# Altium PCB Fred_ New.PcbDoc (part 2 of 2)
Units mil, origin at the board's own origin, x right, y up, seen from the top; angles counter-clockwise.
Board outline 2300 x 2166 mil, 2 copper layers (Top Layer, Bottom Layer), stack 57 mil thick; 107 components, 63 nets, 302 pads, 87 vias.
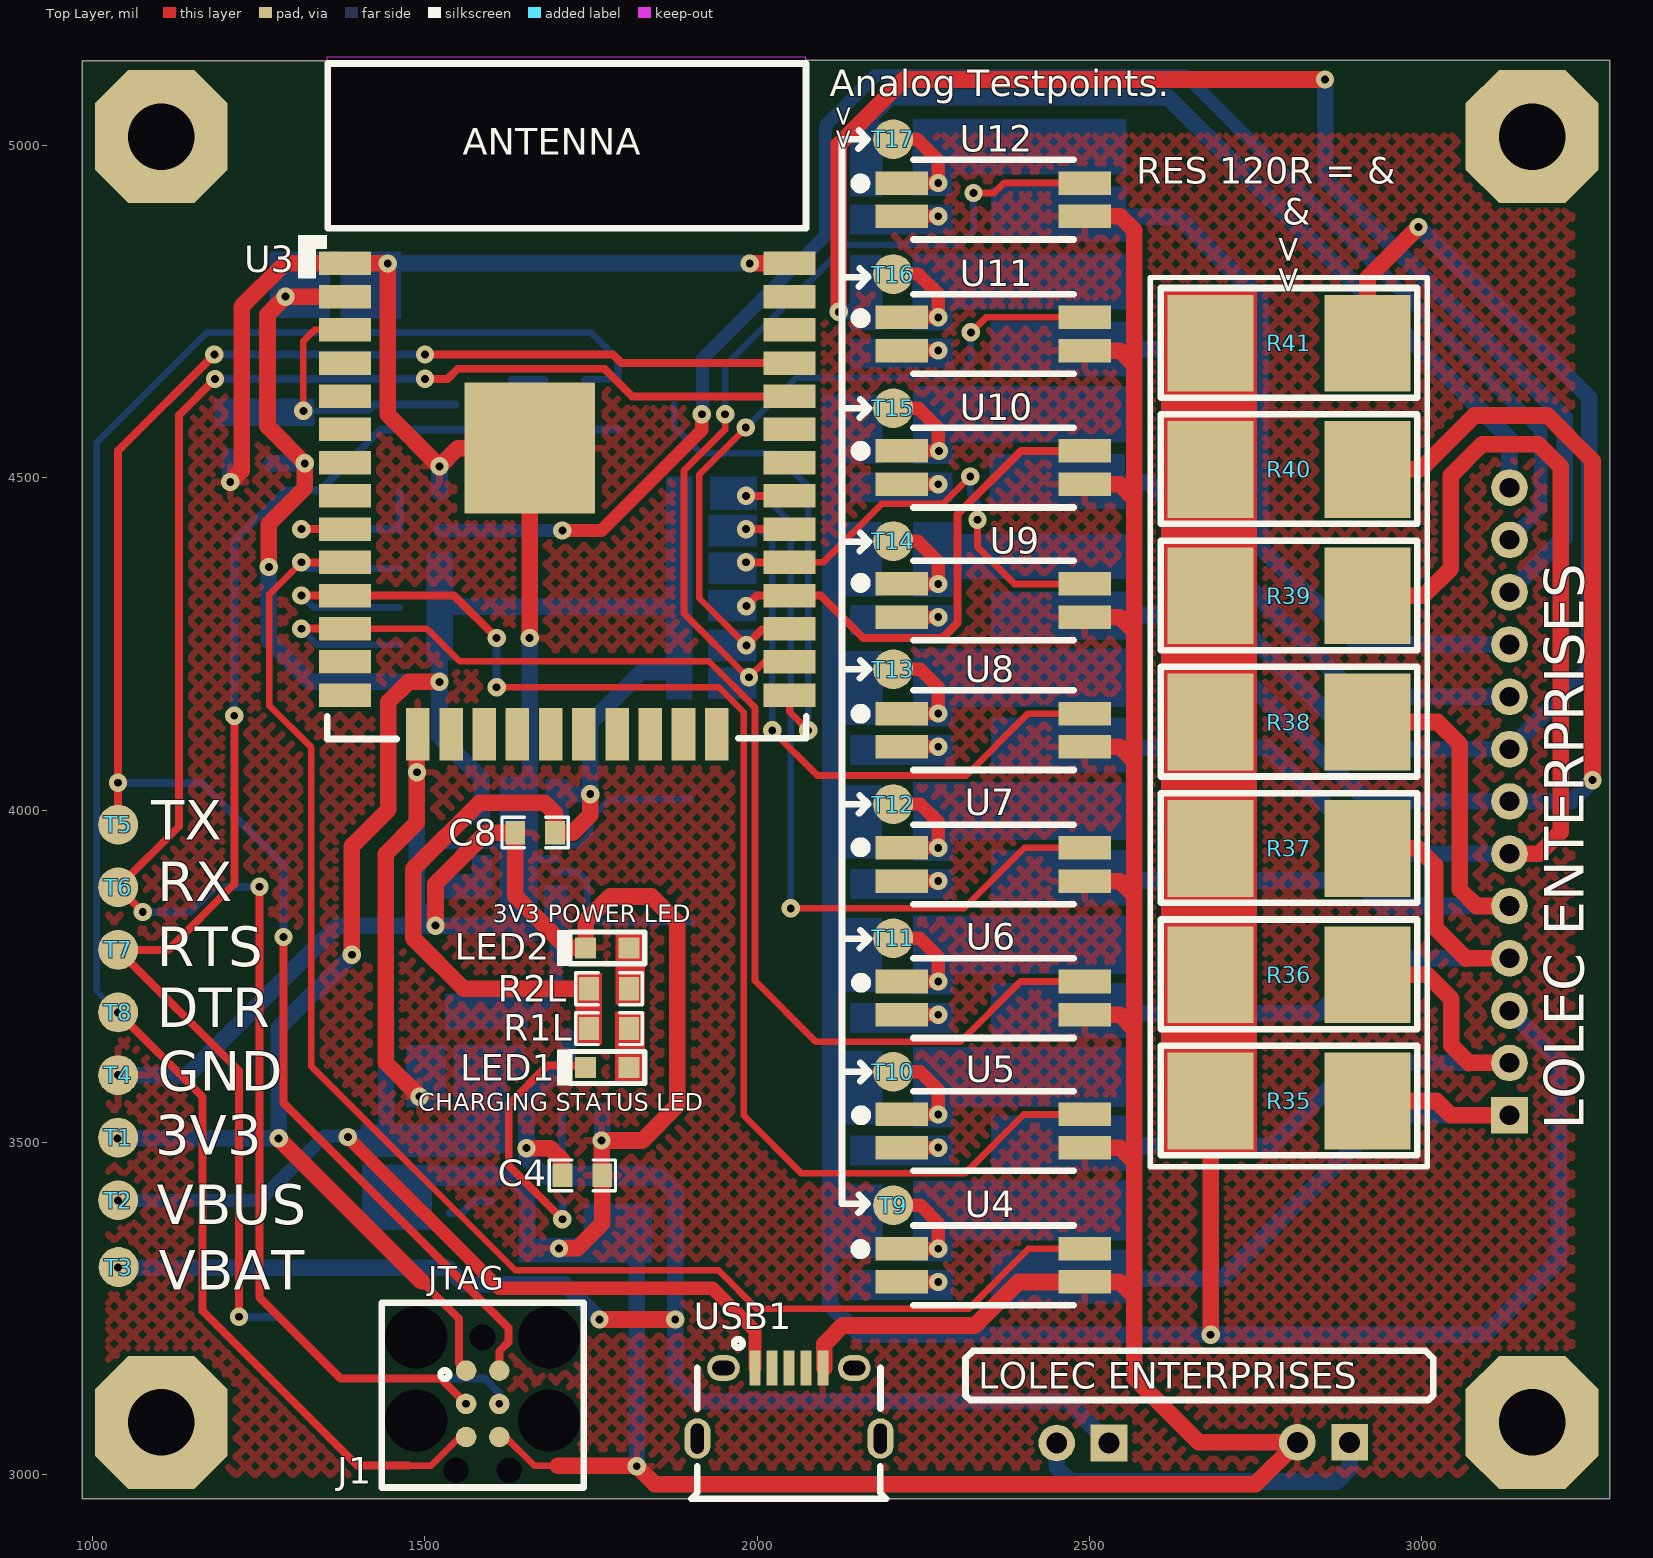
[diagram p0: Top Layer view]

## Via types
v1: diameter 27.56, hole 11.81, Top Layer to Bottom Layer, tented both sides, 57 vias
v2: diameter 27.56, hole 11.81, Top Layer to Bottom Layer, 30 vias

## Nets (pads, with @x,y where several pads share a name; then routed paths per layer and width w, separated by ;. In a path a pad name is that pad's centre, name@x,y a point inside that pad or via, vN(x,y) a via of type N, cw(c..) or ccw(c..) an arc to the next point about the centre after c; other vN are vias at no path point) (continued)
Cath_9: R30.2 U11.2 | length 55
  Top Layer w20: U11.2 v1(2273,4691.81)
Cath_10: R23.2 U12.2 | length 55
  Top Layer w20: U12.2 v1(2273,4894)
CHG: LED1.2 U2.3 | length 377.9
  Top Layer w12: v1(1707,3384) 1626.22,3464.78 1626.22,3556.94 1684.74,3615.46 LED1.2@1742.04,3615.46
  Bottom Layer w12: U2.3 1707,3410.24 v1(1707,3384) v1@1707,3380
DTR: J1.5 Q2.2 R4.2 T8.1 | length 2835.6
  Top Layer w10: 1475,3013 1509.44,3013 1552.44,3056 J1.5
  Top Layer w12: v2(1038,3695.24) 1165,3568.24 1165,3246 1398,3013 1475,3013
  Bottom Layer w10: v2(1038,3695.24) 1006,3727.24 1006,4553.38 1171.62,4719 1750,4719 1790.68,4678.32 Q2.2 1740.69,4648.4 R4.2
ENABLE: C13.1 Q1.3 R19.1 U3.3 | length 456.1
  Top Layer w10: v2(1317,4601) 1317,4706 1334,4723 U3.3
  Bottom Layer w10: R19.1 v2(1317,4601) 1415.41,4601 1424.71,4610.3
  Bottom Layer w12: 1424.71,4610.3 Q1.3
ESP_BATSIG: R16.1 U3.27 U11.4 | length 1066.5
  Top Layer w10: v1@1983.5,4575.5 1913,4505 1913,4319 v1(1984,4248) ; v1(2322,4719.18) 2344.63,4741.81 U11.4
  Top Layer w12: v1(1984,4248) 2007.63,4271.63 2047.63,4271.63 U3.27
  Bottom Layer w10: v1@1983.5,4575.5 2059,4651 2298.34,4651 2322,4674.66 v1(2322,4719.18)
  other v1: 1983,4576
ESP_FOG: R9.1 U3.11 U5.4 | length 2131.3
  Top Layer w10: v2(1608,4185) 1942.36,4185 1980,4147.36 1980,3540 2067,3453 2313,3453 2401.68,3541.68 U5.4
  Top Layer w12: v1(1314,4323) U3.11 1544,4323 v2(1608,4259)
  Bottom Layer w10: v1(1314,4323) 1332,4305 R9.1@1462,4305
  Bottom Layer w12: v2(1608,4185) v2(1608,4259)
ESP_IGNSIG: R17.1 U3.26 U12.4 | length 1313.5
  Top Layer w10: v1(1952,4596) 1952,4573 1890,4511 1890,4296 1986,4200 v1(1988,4200) 2011,4223 U3.26 ; v2(2326,4929) 2357,4929 2372,4944 U12.4 2510.45,4944 U12.4@2511,4943.45
  Bottom Layer w10: v1(1952,4596) 1952,4669 2134,4851 2305,4851 2326,4872 v2(2326,4929)
ESP_LT: R3.1 U3.10 U4.4 | length 2376.2
  Top Layer w10: v1(1314,4373) 1265.58,4324.58 1265.58,4157.42 1329,4094 1329,3614 1636,3307 1942,3307 2000,3249 2318.35,3249 2408.85,3339.5 U4.4
  Top Layer w12: v1(1314,4373) U3.10
  Bottom Layer w10: v1(1314,4373) 1323.37,4363.63 R3.1
ESP_PL: R14.1 U3.29 U9.4 | length 688.8
  Top Layer w10: U3.29 2049.22,4373.22 2100.22,4373.22 2187.91,4460.91 2279.74,4460.91 v2(2321,4502.17) ; v1(2332,4437) 2332,4396 2387.56,4340.44 U9.4
  Top Layer w12: v1(1983.29,4373) U3.29
  Bottom Layer w10: v1@1981.69,4374.6 v1(1983.29,4373) ; v2(2321,4502.17) 2321,4474.44 2332,4463.44 v1(2332,4437)
ESP_PR: R11.1 U3.31 U7.4 | length 1251.4
  Top Layer w10: v2@2051.78,3852 2311.3,3852 2402.36,3943.06 U7.4
  Top Layer w12: v1(1983.29,4473) U3.31
  Bottom Layer w10: R11.1 1978.03,4478.26 v1(1983.29,4473) 2010.83,4473 2049.78,4434.05 ; v2@2050.78,3853 2050.78,4434.05
  other v2: 2050.78,3852
ESP_REV: R15.1 U3.28 U10.4 | length 755.3
  Top Layer w12: v1(1984,4307) 2000,4323 U3.28 2096,4323 2160,4259 2279.44,4259 2302,4281.56 2302,4445.29 2397.33,4540.62 U10.4
ESP_RT: R10.1 U3.12 U6.4 | length 1855.7
  Top Layer w10: U3.12 1503,4273 1552,4224 1927.4,4224 1997,4154.4 1997,3743 2089,3651 2306,3651 2396.87,3741.87 U6.4@2475.5,3741.87
  Top Layer w12: v1(1314,4273) U3.12
  Bottom Layer w10: v1(1314,4273) 1338,4249 R10.1
ESP_SL: R12.1 U3.30 U8.4 | length 934.7
  Top Layer w10: v2(2023,4120) 2091,4052 2315,4052 2408.25,4145.25 U8.4
  Top Layer w12: v1(1983.29,4423) U3.30
  Bottom Layer w10: v1(1983.29,4423) 2004,4423 2023,4404 v2(2023,4120)
"FOG LIGHT": J3.2 R7.2 R36.2 | length 1041.2
  Top Layer w25: R36.2 3008.83,3752.17 3045,3716 3045,3646 3071.92,3619.08 3072.14,3619.3 J3.2 ; J3.2@3123.78,3619.08 J3.2@3124,3619.3
  Bottom Layer w25: R7.2 2774.2,3494.2 2899.3,3619.3 J3.2
GND: C1.2 C2.2 C3.2 C4.2 C5.2 C6.2 C7.2 C8.2 C9.2 C10.2 C11.2 C12.2 C13.2 J1.6 J2#.2 LED2.2 R1.1 R2.1 R34.2 R44.1 T4.1 U1.3 U1.9 U1.11 U2.5 U3.1 U3.15 U3.38 U3.39 U4.3 U5.3 U6.3 U7.3 U8.3 U9.3 U10.3 U11.3 U12.3 USB1.5 | length 10376.7
  Top Layer w10: J1.6 1621.56,3056 1664.56,3013 1700,3013
  Top Layer w25: v2(1207,4494) 1224,4511 1224,4758 1289,4823 U3.1 v1(1444,4823) 1444,4595.49 v2(1522,4517.49) 1549.51,4545 U3.39 v1(1657.71,4259) ; U3.15 1488,4112.59 v1(1488,4057) 1488,3981 1441,3934 1441,3619.5 v1(1492,3568.5) ; v1(1516,3826) 1516,3889 1593,3966 C8.2 1636,3870.48 1714.02,3792.46 LED2.2 1742.04,3833.04 1778.87,3869.87 1841.13,3869.87 1880,3831 1880,3555 1827.5,3502.5 v1(1766,3502.5) 1766,3451 C4.2 1767,3377.69 1729.31,3340 v1(1702,3340) ; 1700,3013 v2@1819,3013 ; v2(1819,3012) 1846,2985 2750.63,2985 J2#.2 2665.42,3048 2568.26,3145.17 2568.26,3267.46 ; v1(1989,4823) U3.38 ; USB1.5@2101.36,3160 2101.36,3196.36 2129,3224 2328,3224 2393.5,3289.5 U4.3 2546.22,3289.5 2568.26,3267.46 ; U5.3 2546.22,3491.68 2568.26,3469.65 ; U6.3 2546.22,3691.87 2568.26,3669.84 ; U7.3 2546.22,3893.06 2568.26,3871.02 ; U8.3 2546.22,4095.25 2568.26,4073.21 ; U9.3 2546.22,4290.44 2568.26,4268.4 ; U10.3 2546.22,4490.62 2568.26,4468.59 ; U11.3 2546.22,4691.81 2568.26,4669.77 ; U12.3 2547,4894 2568.26,4872.74 2568.26,4669.77 ; 2568.26,3267.46 2568.26,3469.65 ; 2568.26,3469.65 2568.26,3669.84 ; 2568.26,3669.84 2568.26,3871.02 ; 2568.26,3871.02 2568.26,4073.21 ; 2568.26,4073.21 2568.26,4268.4 ; 2568.26,4268.4 2568.26,4468.59 ; 2568.26,4468.59 2568.26,4669.77
  Bottom Layer w10: C6.2 1533.06,3946.06 U1.9 U1.11@1634.51,3946.06
  Bottom Layer w12: U1.11 U1.3
  Bottom Layer w25: v2(1038,3600.99) 1143.57,3600.99 1368.58,3826 v1(1516,3826) ; C13.2 1206.83,4494.17 v2(1207,4494) ; v1(1444,4823) v1(1989,4823) ; v1(1488,4057) 1488,3854 v1(1516,3826) ; v1(1492,3568.5) 1507,3583.5 R44.1 ; R34.2 v2(1522,4517.49) ; U2.5 1631.1,3448.5 1654,3425.6 1654,3341.4 1655.4,3340 v1(1702,3340) ; C10.2@1634.52,3826 v1(1516,3826) ; 1657,4028 1657.71,4028.71 v1(1657.71,4259) ; C5.2 C3.2 v2(1819,3012) ; v1(1766,3502.5) 1767,3502.5 R2.1
GND_1: D1.1 D2.1 D3.1 D4.1 D5.1 D6.1 D7.1 J3.3 R20.1 R21.1 R24.1 R25.1 R26.1 R28.1 R29.1 R35.1 R36.1 R37.1 R38.1 R39.1 R40.1 R41.1 | length 3345.9
  Top Layer w25: R35.1@2620.89,3537.12 R35.1@2620.89,3562 ; R35.1 2683,3561.89 v2(2683,3210)
  Bottom Layer w25: R21.1@2164.49,3546.15 R21.1 ; D7.1 2135.5,4603.5 2110.28,4578.28 2110.28,3254.37 2154.65,3210 v2(2683,3210) 3095.39,3210 3207,3321.61 3207,3624.04 J3.3 J3.3@3124,3698.04
"IGNITION POWER": J3.10 R8.2 | length 1164.3
  Bottom Layer w25: R8.2 2633.68,4893.32 2759,4768 2759,4395 2904.78,4249.22 J3.10
IO_0: Q2.3 U3.25 | length 704.2
  Top Layer w10: U3.25 2049,4148 v1(2077,4120)
  Bottom Layer w10: Q2.3 1875.32,4577.68 1916,4537 2027,4537 2077,4487 v1(2077,4120)
IO_33: R33.1 R34.1 U3.9 | length 271.9
  Top Layer w12: v1(1314,4423) U3.9
  Bottom Layer w12: v1(1314,4423) 1459.95,4423 R33.1 R34.1
ISET: R1.2 U2.4 | length 70.3
  Bottom Layer w12: R1.2 1555,3393 1573.1,3411.1 U2.4
"LEFT TURN": J3.1 R6.2 R35.2 | length 1012.3
  Top Layer w25: R35.2 3023,3562 3044.66,3540.34 3044.88,3540.56 J3.1 ; J3.1@3123.78,3540.34 J3.1@3124,3540.56
  Bottom Layer w25: R6.2@2431,3290.32 R6.2@2439,3290.32 ; R6.2 2700.35,3294.32 2946.37,3540.34 3056,3540.34 3056.22,3540.56 J3.1
NetL1_1: L1.1 U1.4 | length 263.6
  Bottom Layer w10: U1.4 1730.31,3906.69 1744,3893 1744,3846.49 1759.01,3831.48 L1.1
NetL1_2: L1.2 U1.2 | length 247.8
  Bottom Layer w10: U1.2 1695.83,3947 1730.74,3947 1749,3965.26 1749,3987.31 1778.21,4016.52 L1.2
NetLED1_1: LED1.1 R1L.1
NetLED2_1: LED2.1 R2L.1
NetQ1_1: Q1.1 R4.1 | length 49
  Bottom Layer w12: Q1.1 R4.1
NetQ2_1: Q2.1 R5.1 | length 50.8
  Bottom Layer w12: R5.1 1790.34,4573.25 Q2.1
P_D: C6.1 U1.6 U1.7 U1.8
"PARK LIGHTS (L)": J3.7 R27.2 R40.2 | length 1815.2
  Top Layer w25: R40.2 2998.83,4512.83 3080,4594 3190,4594 3258,4526 v2(3258,4045)
  Bottom Layer w25: R27.2 2638.3,4293.7 2919,4013 J3.7 3226,4013 v2(3258,4045)
"PARK LIGHTS (R)": J3.5 R18.2 R38.2 | length 1152.3
  Top Layer w25: R38.2 3024.75,4132.5 3058,4099.25 3058,3880.8 3083.5,3855.3 3083.72,3855.52 J3.5 ; J3.5@3123.78,3855.3 J3.5@3124,3855.52
  Bottom Layer w25: R18.2 2903.05,3893.95 2941.48,3855.52 J3.5 ; J3.5@3123.78,3855.3 J3.5@3124,3855.52
"REVERSE LIGHTS": J3.8 R31.2 R41.2 | length 2040.6
  Top Layer w25: R41.2 2919.11,4801.08 v2(2996.03,4878)
  Bottom Layer w25: R31.2 2590.43,4493.57 2668,4416 2668,4337.62 2913.88,4091.74 J3.8 3253,4211.74 3253,4621.03 v2(2996.03,4878)
"RIGHT TURN": J3.4 R13.2 R37.2 | length 1051.2
  Top Layer w25: R37.2 2995.64,3942.23 3021,3916.88 3021,3823 3067.44,3776.56 3067.66,3776.78 J3.4 ; J3.4@3123.78,3776.56 J3.4@3124,3776.78
  Bottom Layer w25: R13.2 2845.55,3694.07 2928.03,3776.56 3021,3776.56 3021.22,3776.78 J3.4
RTS: J1.4 Q1.2 R5.2 T7.1 | length 2352.4
  Top Layer w12: v2(1213,4142) 1213,3889 1113.49,3789.49 T7.1 1220,3607.49 v2(1220,3237)
  Bottom Layer w10: Q1.2 1679.65,4572.9 R5.2
  Bottom Layer w12: v2(1213,4142) 1213,4405 1289.23,4481.23 1341.94,4481.23 1433.61,4572.9 Q1.2 ; v2(1220,3237) 1280,3237 1373,3144 1590,3144 1612,3122 v2(1612,3106)
RX: J1.3 T6.1 U3.34 | length 2954.1
  Top Layer w12: v2(1075.14,3846.61) T6.1 1130,3975.75 1130,4595 v2(1184,4649) ; v2(1251,3884.5) 1251,3266 1373,3144 1524,3144 v2(1562,3106) ; v1(1500,4649.21) 1534.21,4649.21 1549.44,4664.44 1770.21,4664.44 1811.65,4623 U3.34
  Bottom Layer w12: v2(1075.14,3846.61) 1146.61,3846.61 1184.5,3884.5 v2(1251,3884.5) ; v2@1184,4649.21 v1(1500,4649.21)
"STOP LIGHTS": J3.6 R22.2 R39.2 | length 1876.2
  Top Layer w25: R39.2 3003.67,4322.67 3044.66,4363.66 3044.66,4503.66 3092,4551 3176,4551 3210,4517 3210,3967 3177.26,3934.26 J3.6 J3.6@3124,3934.26
  Bottom Layer w25: R22.2 2769.18,4093.82 2928.74,3934.26 3077,3934.26 J3.6
TS: R2.2 U2.1 | length 61.5
  Bottom Layer w12: U2.1 1706.15,3546.15 R2.2
TX: J1.2 T5.1 U3.35 | length 2847.2
  Top Layer w12: T5.1 v2(1038,4041) 1038,4541 v1(1183,4686) ; v2(1287,3809) 1287,3559 1626,3220 1626,3199 1612,3185 J1.2 ; v1(1500,4686) 1783,4686 1796,4673 U3.35
  Bottom Layer w12: v2(1038,4041) 1163.31,4041 1287,3917.31 v2(1287,3809) ; v1(1183,4686) v1(1500,4686)
VBAT: C3.1 C4.1 C5.1 J2.1 Q3.3 T3.1 U2.2 | length 2258.1
  Top Layer w25: v1(1653,3491) 1688.51,3491 1707,3472.51 C4.1 ; v2(1763,3233) v2@1866,3233
  Bottom Layer w25: v1(1038,3311) 1534,3311 1559,3286 1710,3286 v2(1763,3233) ; U2.2 1680.76,3448.5 1653,3476.25 v1(1653,3491) 1653,3562.99 1715,3624.99 Q3.3 ; C3.1 1853,3448 1877,3424 v2(1877,3233) 1877,3145 1912,3110 2467,3110 J2.1
VBAT_M: J2#.1 J2.2 | length 534.6
  Bottom Layer w25: J2.2 2451.26,3009.74 2472,2989 2873,2989 2892.37,3008.37 J2#.1
VBUS: C1.1 C2.1 C9.1 D22.1 Q3.1 R44.2 T2.1 U2.6 USB1.1 | length 1465.6
  Top Layer w20: v2(1384,3507.69) 1611.69,3280 1933,3280 1997,3216 USB1.1@1997,3160.18
  Bottom Layer w20: v1(1038,3412) 1251.5,3412 1348.5,3509 C9.1@1429,3509 ; C9.1@1442,3506.5 C1.1 C1.1@1493,3512.5 ; D22.1@1442,3695 D22.1@1444,3697
  Bottom Layer w25: C9.1@1442,3506.5 D22.1@1442,3695
VCC: C10.1 D22.2 Q3.2 U1.5 | length 189.1
  Bottom Layer w20: Q3.2@1621.35,3696.4 Q3.2 1667.4,3696.4 1697.52,3726.52 C10.1@1697.52,3827
pads on no net: J1.MP1 J1.MP2 J1.MP3 J1.MP4 J1.MP5 J1.MP6 J1.MP7 U3.4 U3.5 U3.6 U3.7 U3.8 U3.13 U3.14 U3.16 U3.17 U3.18 U3.19 U3.20 U3.21 U3.22 U3.23 U3.24 U3.32 U3.33 U3.36 U3.37 USB1.2 USB1.3 USB1.4 USB1.MH1 USB1.MH2 USB1.MH3 USB1.MH4

## Polygon pours and split planes (outlines as drawn)
GND on Top Layer "Top Layer-GND" (hatched 45Degree grid 20 track 10, remove dead copper, pour order 1): 1023,4897 1255.33,4897 1255.33,4776.62 2205,4776.62 2205,5015.22 3227,5015.46 3227,2999.42 1023,2999.42
no net on Top Layer "Top Layer-No Net" (solid, pour order 0): 660,5128
GND on Bottom Layer "Bottom Layer-GND" (hatched 45Degree grid 20 track 10, remove dead copper, pour order 3): 1018,4897.07 1259,4896.93 1259,4749 2174,4749 2174,4996.4 3234,4996.65 3234,3013 1018,3013

## Other copper
Top Layer:
  rectangle net GND_1: 2608,3478 2753,4786
  rectangle net 3V3: 1727,3647.01 1767,3754.99
  rectangle net NetLED1_1: 1786,3588.45 1831,3696.43
  rectangle net NetLED2_1: 1787,3707.02 1831,3815
Bottom Layer:
  rectangle net "LEFT TURN": 2352,3257 2556,3338
  rectangle net "FOG LIGHT": 2352,3456.88 2556,3539.88
  rectangle net "RIGHT TURN": 2352,3656.75 2556,3739.75
  rectangle net "PARK LIGHTS (R)": 2352,3856.62 2556,3939.62
  rectangle net "STOP LIGHTS": 2352,4056.5 2556,4139.5
  rectangle net "PARK LIGHTS (L)": 2352,4256.38 2556,4329
  rectangle net "REVERSE LIGHTS": 2350,4453.3 2554,4536.3
  rectangle net "BATTERY POWER": 2351.25,4652.81 2555.25,4735.81
  rectangle net "IGNITION POWER": 2352,4856 2556,4939
  rectangle net AN_1: 2235.02,3352 2556,3442
  rectangle net AN_2: 2235.02,3553 2556,3643
  rectangle net AN_4: 2235.02,3753 2556,3841
  rectangle net AN_5: 2235.02,3955 2556,4042
  rectangle net AN_6: 2235.02,4155 2556,4243
  rectangle net AN_8: 2236.02,4553.25 2557,4638.25
  rectangle net AN_9: 2235.02,4754 2556,4838.12
  rectangle net Cath_1: 2140,3262.31 2295,3307.44
  rectangle net Cath_2: 2140,3464.5 2295,3509.62
  rectangle net Cath_4: 2140,3664.69 2295,3709.81
  rectangle net Cath_6: 2140,4068.06 2295,4113.19
  rectangle net Cath_7: 2140,4263.25 2295,4308.38
  rectangle net Cath_8: 2140,4463.44 2294,4508.56
  rectangle net Cath_9: 2140,4664.63 2295,4709.75
  rectangle net Cath_10: 2140,4866.81 2295,4911.94
  rectangle net AN_7: 2235.02,4347.61 2556,4416
  rectangle net AN_10: 2235.02,4957 2556,5040.5
  rectangle net AN_10: 2234,4924.5 2294,5036.88
  rectangle net AN_9: 2234,4722.31 2294,4834.69
  rectangle net AN_8: 2235,4521.13 2295,4633.5
  rectangle net AN_7: 2235,4320.94 2295,4434
  rectangle net AN_6: 2235,4125.75 2295,4239
  rectangle net AN_5: 2235,3923.56 2295,4038
  rectangle net AN_4: 2235,3722.38 2295,3836
  rectangle net AN_2: 2235,3522.19 2295,3638
  rectangle net GND_1: 2100,3324.89 2189.02,3436.5
  rectangle net GND_1: 2101,3526.51 2189.02,3638
  rectangle net GND_1: 2100,3726.14 2188.5,3837.5
  rectangle net GND_1: 2100,3926.76 2188.5,4038
  rectangle net GND_1: 2100,4127.88 2189.02,4239.5
  rectangle net GND_1: 2100,4321.81 2188.5,4434
  rectangle net GND_1: 2097,4522 2189.02,4625.5
  region net ENABLE: 1334,4578 1334,4620 1183.83,4620 1183.83,4578
  rectangle net 3V3: 1266,4740.6 1357,4840.6
  rectangle net GND: 1373,4740 1464,4840.6
  region net GND: 1842,3355.69 1641,3355.69 1641,3319 1842,3319
  region net VCC: 1714.52,3887 1679.65,3887 1679.65,3806 1714.52,3806
  rectangle net Cath_5: 2140,3865.88 2295,3911
  rectangle net AN_1: 2235,3320 2295,3436
  rectangle net 2_GND: 2139.71,4722.89 2189.02,4835.89
  rectangle net 3_GND: 2139.71,4924 2189.02,5037
  rectangle net GND: 1471.26,3552 1531,3646
  rectangle net ESP_IGNSIG: 1926,4167 1999,4214.63
  rectangle net ESP_BATSIG: 1926,4224 1999,4271.63
  rectangle net ESP_REV: 1926,4284 1999,4331.63
  rectangle net ESP_PL: 1927,4340 1999,4387.63
  rectangle net ESP_SL: 1927,4397 2000,4444.95
  rectangle net ESP_PR: 1929,4452 2000,4502.26
  rectangle net 3V3: 1863,4166.5 1902.98,4502.26
  rectangle net 3V3: 1502.02,4225 1542,4388
  rectangle net VBUS: 1543.04,3484 1623,3647
  region net VBAT: 1683,3464.5 1683,3433.6 1842,3433.6 1842,3464.5
  region net GND: 1842,3318.35 1842,3407.9 1738.49,3407.9 1738.49,3318.35
  region net GND: 1510.82,3466 1405,3466 1405,3368 1510.82,3368
  region net GND: 1623.85,3434 1623.85,3464.9 1464.49,3464.9 1464.49,3434
  region net VBUS: 1404,3527 1404,3477.5 1601.35,3477.5 1601.35,3527
  region net VBUS: 1547.18,3645.73 1547.18,3591.74 1649,3591.74 1649,3645.73
  region net VCC: 1530,3723.73 1530,3669.74 1655.4,3669.74 1655.4,3723.73
  region net P_D: 1510.72,3903.5 1510.72,3866 1598.72,3866 1598.72,3903.5
  region net P_D: 1601.18,3932 1571,3932 1571,3866 1601.18,3866
  rectangle net GND: 1612.04,3803 1670,4050
  rectangle net 3V3: 1680.52,3959 1716,4047

## Silkscreen, mask and mechanical layers (free items; w line width, h text height)
Top Overlay:
  lines w7.87: 2592,3463 2592,4802 ; 2593,3463 3008,3463 ; 2593,4802 3008,4802 ; 3009,3463 3009,4802
  lines w10: 2128,5007.25 2128,3407.49 2166.71,3407.49 2153.64,3420.56 ; 2128,5010 2166.71,5010 2153.64,5023.07 ; 2129,4009 2167.71,4009 2154.64,4022.07 ; 2129,4802.34 2167.71,4802.34 2154.64,4815.41 ; 2130,4212.25 2168.71,4212.25 2155.64,4225.32 ; 2130,4404 2168.71,4404 2155.64,4417.07 ; 2130,4605 2168.71,4605 2155.64,4618.07 ; 2131,3606 2168.71,3606 2155.64,3619.07 ; 2131,3806 2168.71,3806 2155.64,3819.07 ; 2152.65,3393.43 2165.72,3406.5 ; 2152.65,4995.94 2165.72,5009.01 ; 2153.65,3994.94 2166.72,4008.01 ; 2153.65,4788.28 2166.72,4801.35 ; 2154.65,3791.94 2167.72,3805.01 ; 2154.65,4198.19 2167.72,4211.26 ; 2154.65,4389.94 2167.72,4403.01 ; 2154.65,4590.94 2167.72,4604.01 ; 2155.65,3591.94 2168.72,3605.01 ; 2314,3118.69 2314,3174.69 2325,3185.69 3007,3185.69 3018,3174.69 3018,3118.69 3011,3111.69 2321,3111.69 2314,3118.69
  text "Analog Testpoints." at 2109.21,5075 h40
  text ">>" at 2117,5061.95 h30 r270
  text "RES 120R = &" at 2571,4943 h40
  text "&" at 2791,4881 h40
  text ">>" at 2783,4867 h40 r270
  text "TX" at 1088,3955 h60
  text "RX" at 1097,3862.48 h60
  text "3V3 POWER LED" at 1602,3822 h45
  text "RTS" at 1096,3764.79 h60
  text "DTR" at 1096,3673 h60
  text "GND" at 1098,3577 h60
  text "CHARGING STATUS LED" at 1490,3538 h45
  text "LOLEC ENTERPRISES" at 3245,3519 h60 r90
  text "3V3" at 1094,3481 h60
  text "VBUS" at 1096,3376 h60
  text "VBAT" at 1099,3278 h60
  text "JTAG" at 1505,3266 h60
  text "LOLEC ENTERPRISES" at 2333,3128.69 h40
Bottom Overlay:
  drawing of 3079 lines, arcs and shapes, not listed
  text "#" at 2592,5036.88 h40 r180
  text "$" at 2127,5022 h40 r180
  text "*" at 2103,4930 h40 r180
  text "RES 200R = *" at 3261,4847 h40
  text "#" at 2591,4834 h40 r180
  text "RES 3.3K = @" at 3261,4791 h40
  text "$" at 2101,4783 h40
  text "RES 390R = #" at 3261,4738 h40
  text "*" at 2105,4730 h40 r180
  text "DIODE Z 3.3V = $" at 3260,4680 h40
  text "#" at 2592,4633 h40 r180
  text "$" at 2100.37,4583 h40
  text "*" at 2105,4526.04 h40 r180
  text "@" at 1826,4457 h40
  text "#" at 2592,4433 h40 r180
  text "@" at 1826,4399 h40
  text "$" at 2100.37,4385 h40
  text "@" at 1826,4343 h40
  text "@" at 1553,4342 h40
  text "*" at 2105,4329 h40 r180
  text "@" at 1553,4285 h40
  text "@" at 1826,4284 h40
  text "@" at 1553,4229 h40
  text "@" at 1827,4228 h40
  text "$" at 2100.37,4189.58 h40
  text "@" at 1827,4171 h40
  text "*" at 2105,4135 h40 r180
  text "ZERO CARBON FOOTPRINT" at 3040,4120 h38 r90
  text "#" at 2344,4108 h40 r180
  text "#" at 2591,4033.5 h40 r180
  text "$" at 2100,3987 h40
  text "*" at 2105,3936 h40 r180
  text "#" at 2590.43,3833.04 h40 r180
  text "$" at 2099,3787 h40
  text "*" at 2105,3734 h40 r180
  text "#" at 2592,3636 h40 r180
  text "$" at 2100,3585 h40
  text "*" at 2105,3534 h40 r180
  text "#" at 2591,3432 h40 r180
  text "$" at 2099,3386 h40
  text "*" at 2105,3332 h40 r180
Mechanical 2:
  the board outline again, w10

## Dimensions
984,5128 to 3284,5129 on Mechanical 1
984,5128 to 984,2963 on Mechanical 1

## Text inside footprints (layer, text, board x,y; h text height)
U3: Top Overlay "ANTENNA" at 1556.71,4987 h40